# Altium PCB RemoteSensorUnit-v1.0.PcbDoc (part 1 of 5)
Units mm, origin at the board's own origin, x right, y up, seen from the top; angles counter-clockwise.
Board outline 80 x 114 mm, 2 copper layers (Top Layer, Bottom Layer), stack 1.448 mm thick; 163 components, 122 nets, 631 pads, 300 vias.
Unrouted connection lines stored in the file: 147.
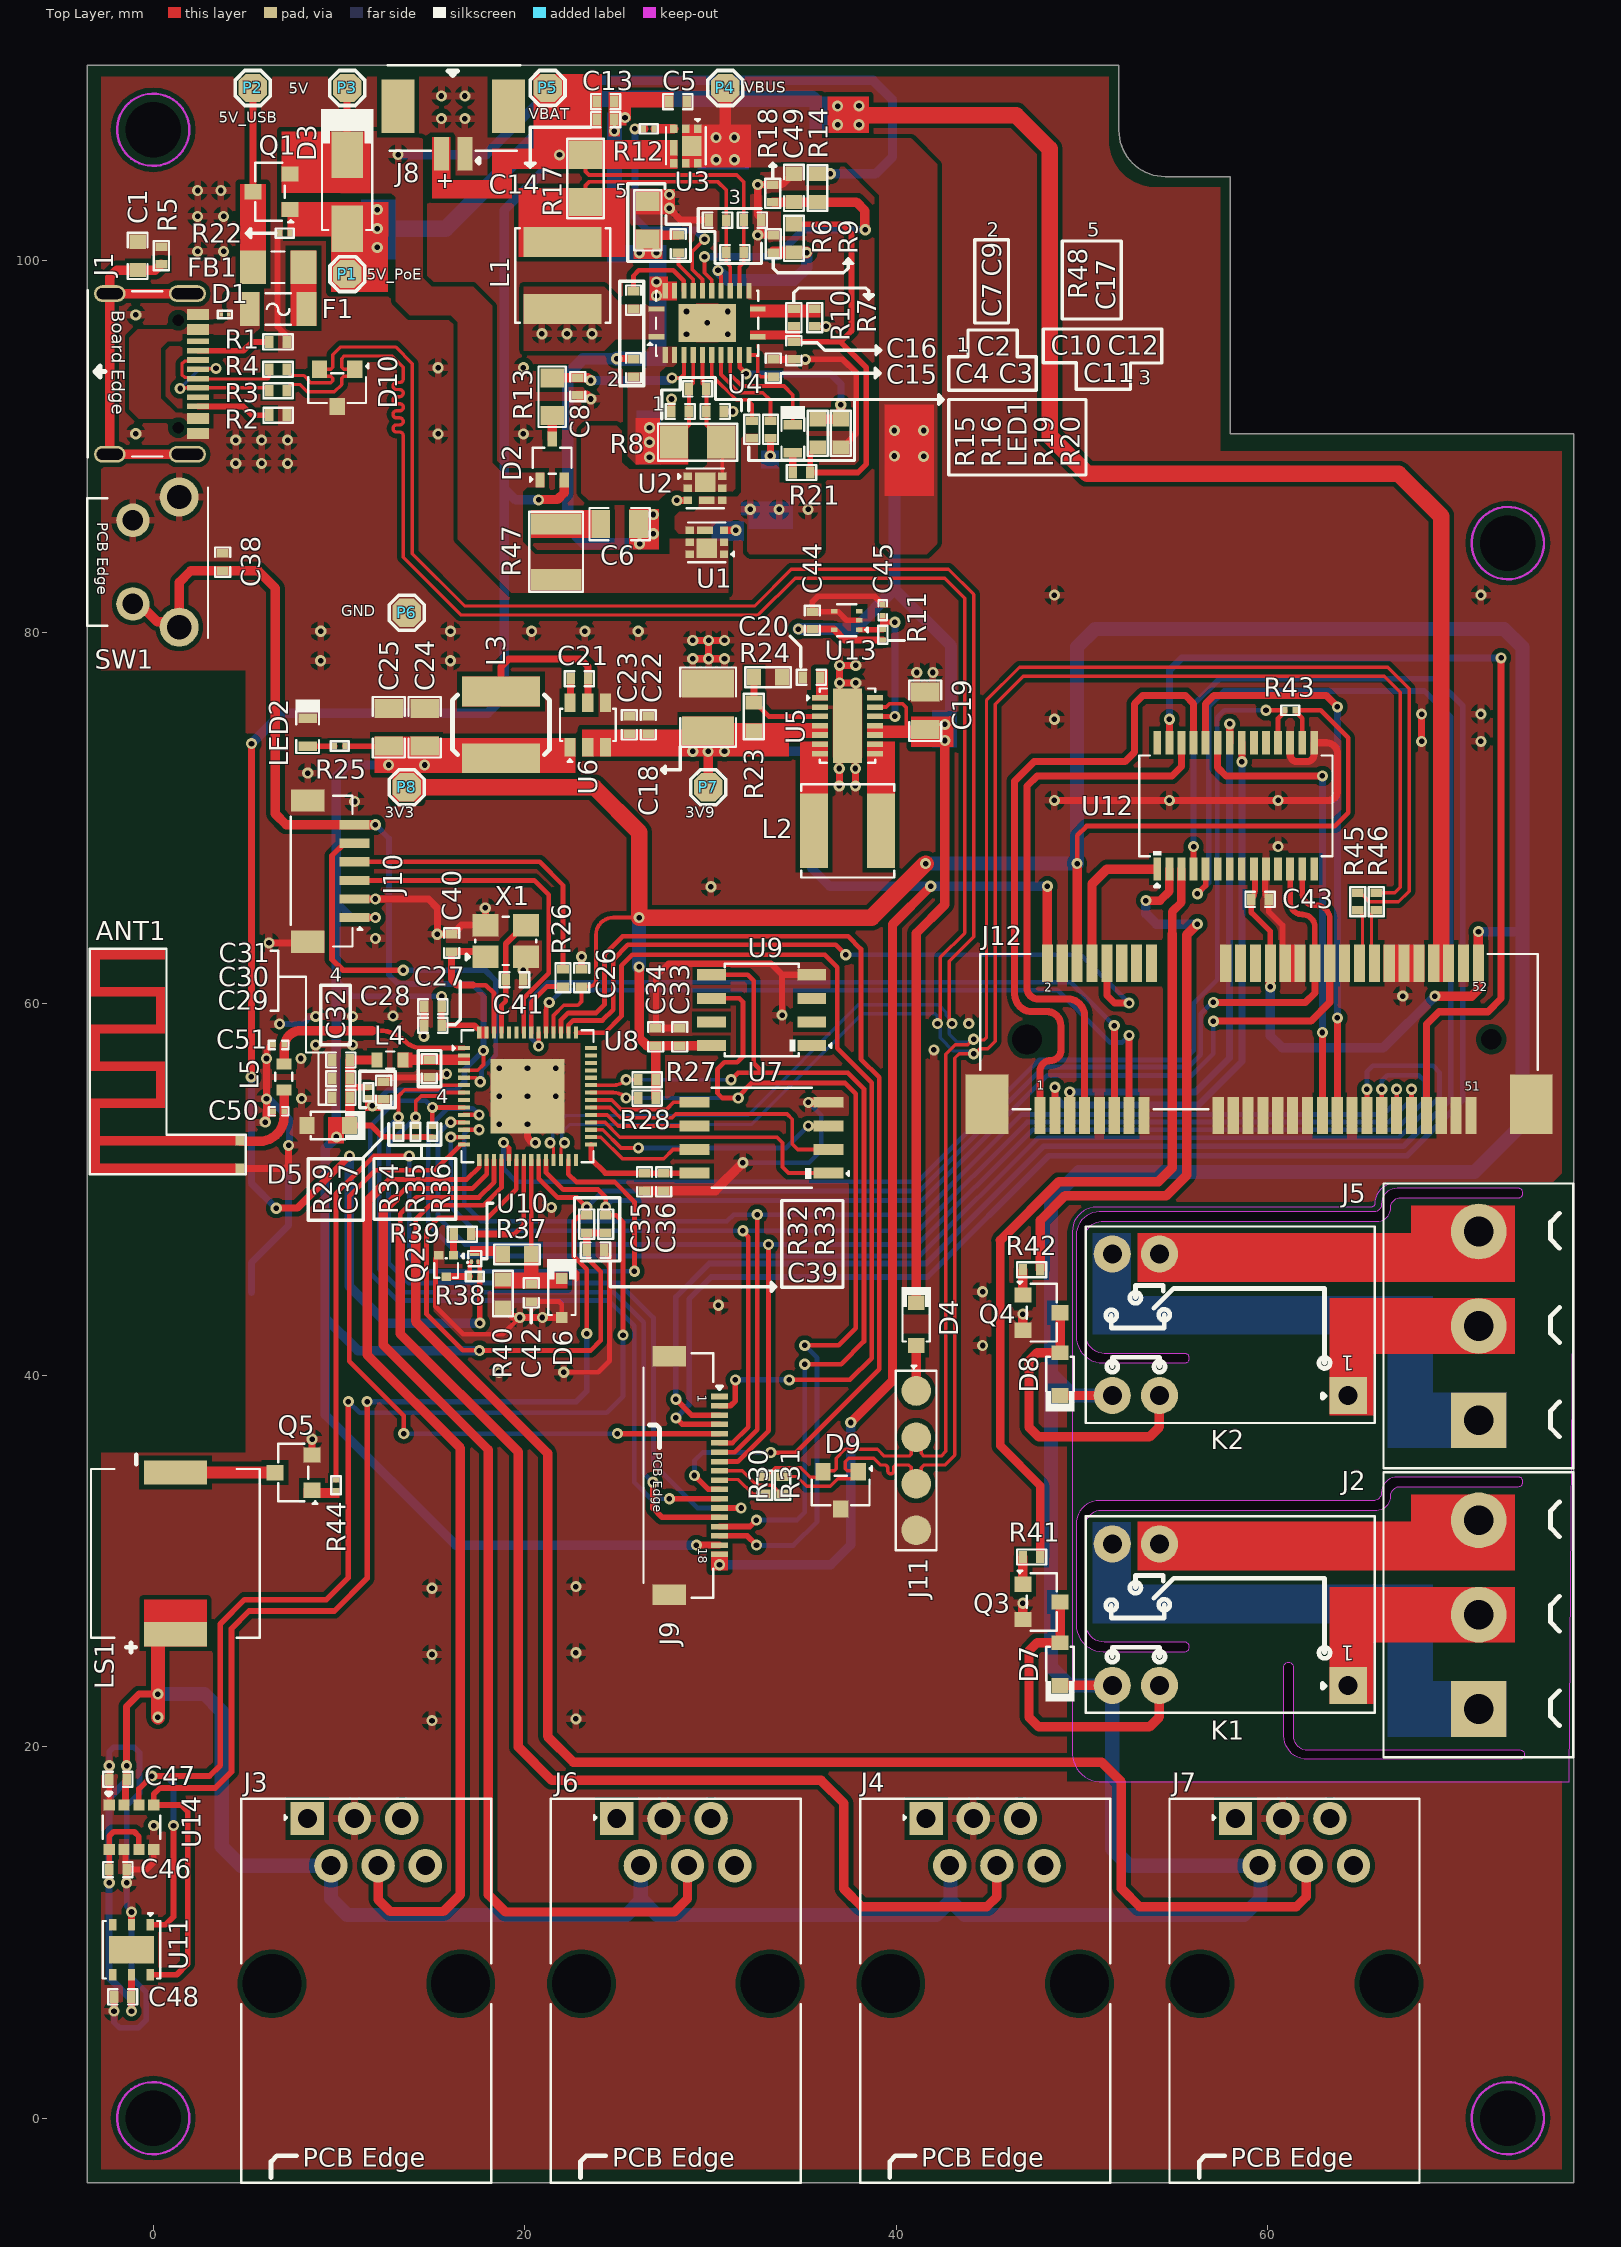
[diagram p0: Top Layer view]
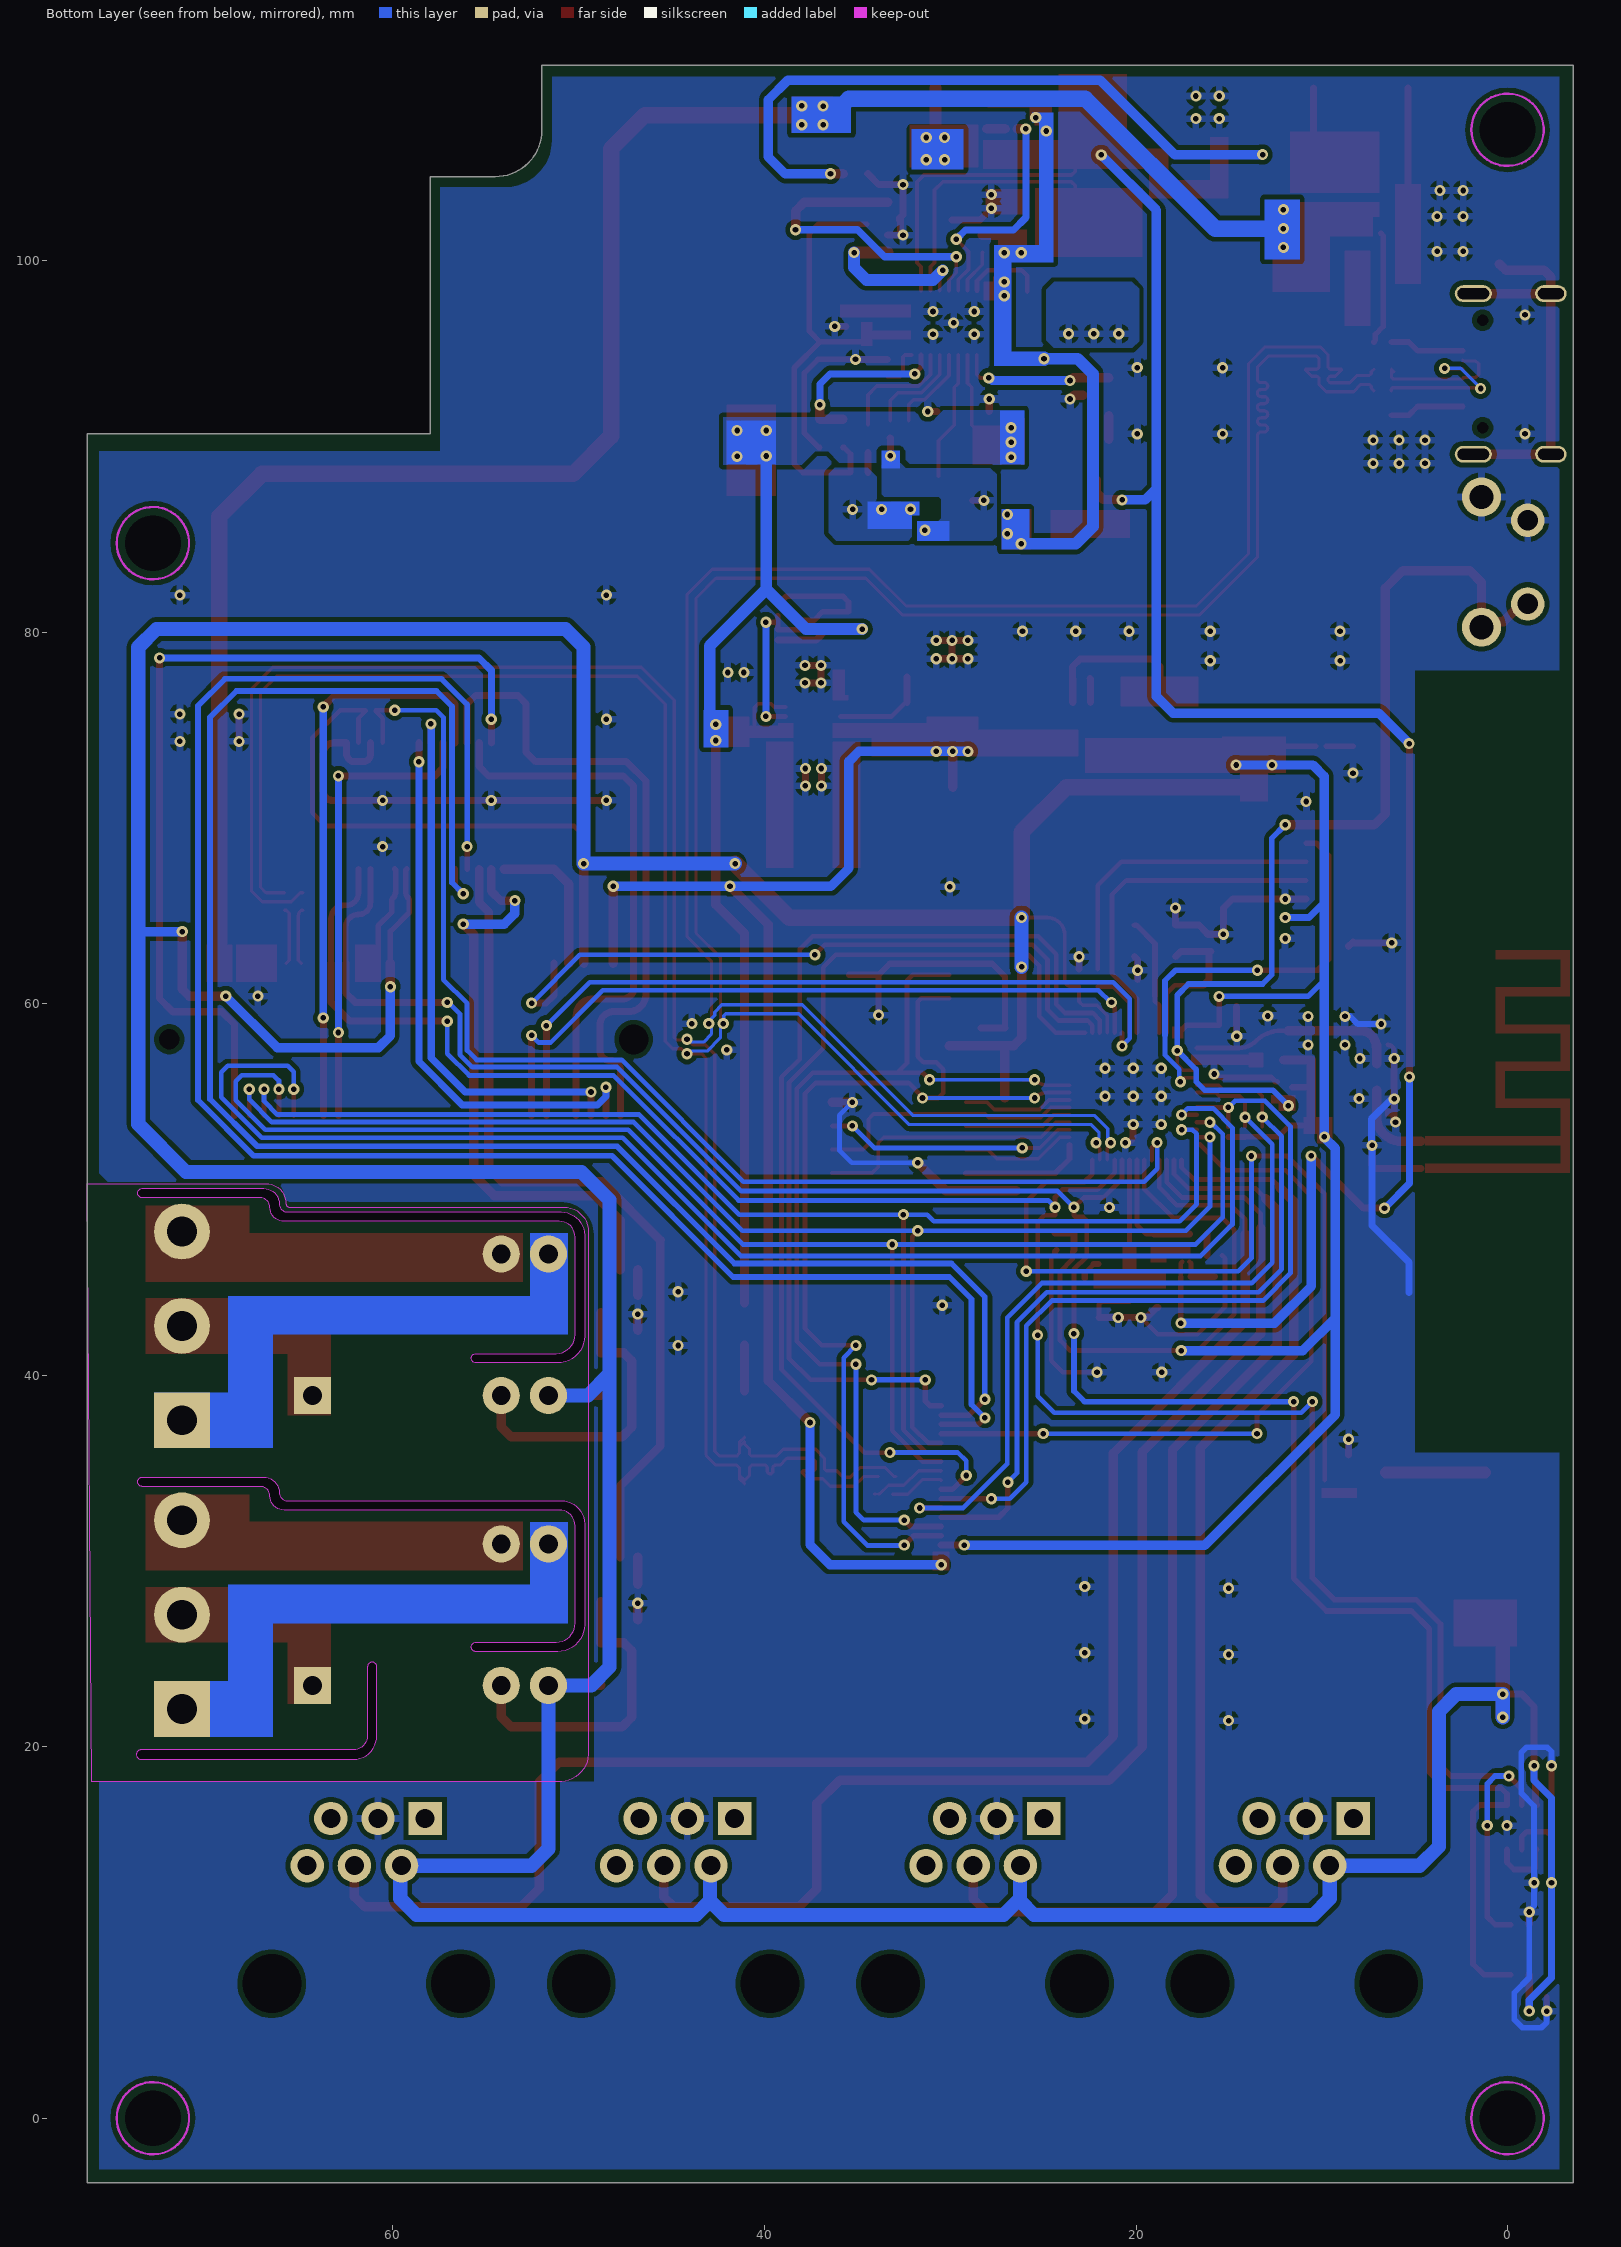
[diagram p1: Bottom Layer view, seen from below]
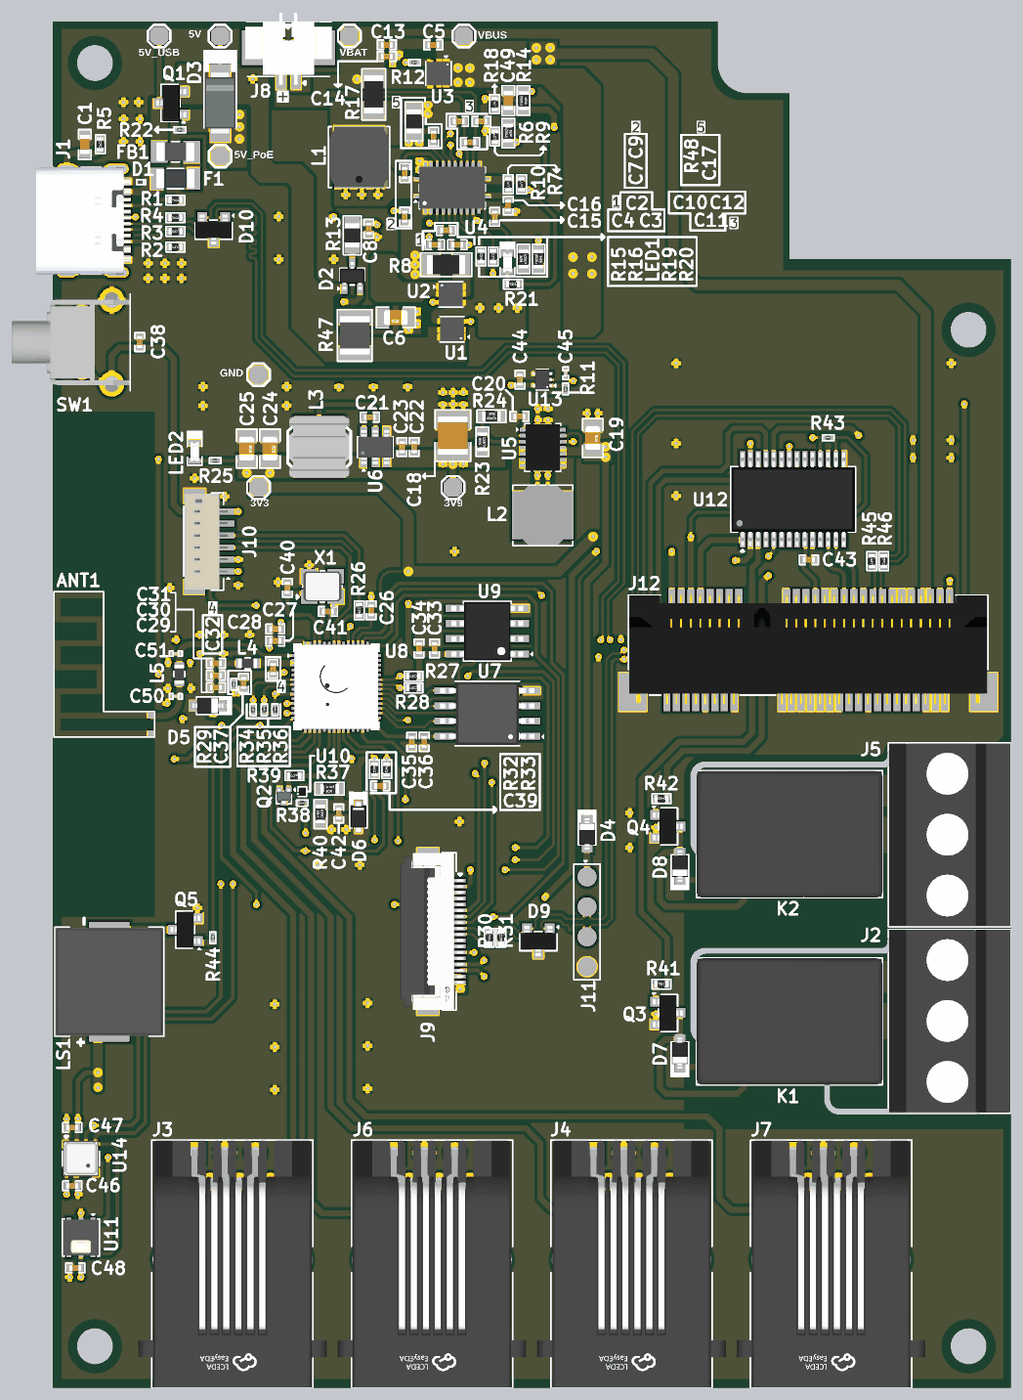
[diagram p4: 3D render of the assembled board from above, using the file's embedded part models]

## Layer stack, top to bottom
Top Solder: solder mask 0.0762, SM-001, Dk 4
Top Layer: signal copper 0.254
Dielectric 1: dielectric 0.9398, FR-4, Dk 4.8
Bottom Layer: signal copper 0.254
Bottom Solder: solder mask 0.0762, SM-001, Dk 4

## Board outline
-3.538,-3.476 -3.538,110.524 51.988,110.524 51.988,107.024 ccw(c54.488,107.024) 54.488,104.524 57.988,104.524 57.988,90.693 76.462,90.693 76.462,-3.476
cut-out: 49.689,42.11 ccw(c51.139,42.11) 51.139,40.66 55.531,40.66 ccw(c55.531,40.914) 55.785,40.914 ccw(c55.531,40.914) 55.531,41.168 51.212,41.168 cw(c51.212,42.183) 50.197,42.183 50.197,47.441 cw(c51.037,47.441) 51.037,48.28 65.864,48.28 ccw(c65.864,49.047) 66.63,49.047 cw(c67.134,49.047) 67.134,49.55 73.488,49.55 ccw(c73.488,49.804) 73.742,49.804 ccw(c73.488,49.804) 73.488,50.058 66.966,50.058 ccw(c66.966,49.215) 66.122,49.215 cw(c65.696,49.215) 65.696,48.788 50.942,48.788 ccw(c50.942,47.536) 49.689,47.536
cut-out: 49.689,26.567 ccw(c51.139,26.567) 51.139,25.117 55.531,25.117 ccw(c55.531,25.371) 55.785,25.371 ccw(c55.531,25.371) 55.531,25.625 51.212,25.625 cw(c51.212,26.64) 50.197,26.64 50.197,31.898 cw(c51.037,31.898) 51.037,32.737 65.864,32.737 ccw(c65.864,33.504) 66.63,33.504 cw(c67.134,33.504) 67.134,34.007 73.488,34.007 ccw(c73.488,34.261) 73.742,34.261 ccw(c73.488,34.261) 73.488,34.515 66.966,34.515 ccw(c66.966,33.672) 66.122,33.672 cw(c65.696,33.672) 65.696,33.245 50.942,33.245 ccw(c50.942,31.993) 49.689,31.993
cut-out: 60.865,20.594 60.865,24.299 cw(c61.119,24.299) 61.119,24.553 cw(c61.119,24.299) 61.373,24.299 61.373,20.594 ccw(c62.135,20.594) 62.135,19.832 73.565,19.832 cw(c73.565,19.578) 73.819,19.578 cw(c73.565,19.578) 73.565,19.324 62.135,19.324 cw(c62.135,20.594)

## Design rules (kind name [scope] priority, off if disabled: settings)
Clearance [All] p1: gap=0.178 ignorepadtopadclearanceinfootprint=TRUE except(0.127: Track-Track Track-SMDPad Track-Fill Poly-Hole; 0.254: Arc-Poly Track-Poly SMDPad-Poly THPad-Poly Via-Poly Fill-Poly Poly-Poly)
ComponentClearance [All] p1: gap=0 collisioncheckmode=3 verticalgap=0 showdistances=FALSE
DiffPairsRouting [InDifferentialPairClass('USB_DIFF_Lines')] p1: maxlimit=0.305 minlimit=0.305 mostfreqgap=0.305 toplayer_minwidth=0.178 toplayer_maxwidth=0.178 toplayer_prefwidth=0.178 bottomlayer_minwidth=0.178 bottomlayer_maxwidth=0.178 bottomlayer_prefwidth=0.178 impedanceprofiledriven=TRUE impedanceprofileid={DBD143A9-7C60-4718-A0EA-CE822F126A81} impedanceprofilevalue=90.000000 maxuncoupledlength=17.653
HoleSize [All] p1: absolutevalues=TRUE maxlimit=6 minlimit=0.025 maxpercent=80.000 minpercent=20.000
MatchedLengths "Schematic Matched Net Lengths_2" [InNetClass('USB_DIFF')] p1: tolerance=0.508 checknetsindiffpair=TRUE checkdiffpairvsdiffpair=FALSE checkxsignals=FALSE checkothers=FALSE
MaxMinImpedance "Schematic Impedance Constraint_4" [InNetClass('GSM_USB')] p1: minimum=88.00 maximum=90.00
MaxMinImpedance "Schematic Impedance Constraint_2" [InNetClass('USB_DIFF')] p2: minimum=85.00 maximum=95.00
MinimumSolderMaskSliver [All] p1: minsoldermaskwidth=0
PolygonConnect [All] p1: thpad.connectstyle=Relief thpad.reliefconductorwidth=0.381 thpad.reliefentries=4 thpad.polygonreliefangle="90 Angle" thpad.airgapwidth=0.254 smdpad.connectstyle=Direct smdpad.reliefconductorwidth=0.381 smdpad.reliefentries=4 smdpad.polygonreliefangle="90 Angle" smdpad.airgapwidth=0.254 via.connectstyle=Relief via.reliefconductorwidth=0.381 via.reliefentries=4 via.polygonreliefangle="90 Angle" via.airgapwidth=0.254
RoutingVias [All] p1: holewidth=0.3 width=0.6 viastyle="Through Hole" minholewidth=0.3 minwidth=0.6 maxholewidth=0.3 maxwidth=0.6
SilkToSilkClearance [All] p1: silktosilkclearance=0
SilkToSolderMaskClearance [IsPad] p1: minsilkscreentomaskgap=0 clearancetoexposedcopper=TRUE
SolderMaskExpansion [All] p1: expansion=0.102 istentingtop=FALSE
UnRoutedNet [All] p1: checkbadconnections=TRUE
Width [All] p1: maxlimit=1 minlimit=0.178 preferedwidth=0.381 minimp=50.000000 maximp=50.000000 favimp=50.000000
23 further rules are at their usual default settings.

## Classes and differential pairs
differential pair class GSM_USB_Lines: USB.USB
net class GSM_USB: USB.USB_N USB.USB_P
differential pair class USB_DIFF_Lines: USB.USB
net class USB_DIFF: USB.USB_N USB.USB_P
component class U_Relay_Buzzer_Temp_Humd_Sheet: C43 C46 C47 C48 D7 D8 K1 K2 LS1 Q3 Q4 Q5 R41 R42 R43 R44 U11 U12 U14
component class U_Power_Sheet2: C18 C19 C20 C21 C22 C23 C24 C25 C44 C45 L2 L3 LED2 P7 P8 R11 R23 R24 R25 U5 U6 U13
component class U_Power_Sheet1: C2 C3 C4 C5 C6 C7 C8 C9 C10 C11 C12 C13 C14 C15 C16 C17 C49 D2 D3 L1 LED1 P1 P2 P3 P4 P5 P6 Q1 R6 R7 R8 R9 R10 R12 R13 R14 R15 R16 R17 R18 R19 R20 R21 R22 R47 R48 U1 U2 U3 U4
component class U_mPCIe_Connector_Sheet: J12 R45 R46
component class U_Controller_Sheet: ANT1 C26 C27 C28 C29 C30 C31 C32 C33 C34 C35 C36 C37 C38 C39 C40 C41 C42 C50 C51 D4 D5 D6 D9 J9 J10 J11 L4 L5 Q2 R26 R27 R28 R29 R30 R31 R32 R33 R34 R35 R36 R37 R38 R39 R40 SW1 U7 U8 U9 U10 X1
component class U_Connector_Sheet: C1 D1 D10 F1 FB1 J1 J2 J3 J4 J5 J6 J7 J8 R1 R2 R3 R4 R5
differential pair USB.USB: +USB.USB_P -USB.USB_N

## Components (designator, comment, footprint, x,y, rotation, side; value= is the part's Value field where it differs from the comment)
ANT1 "Antenna" ANT* 1.59,55.815 r90 top locked net-tie
C1 "4.7nF" Cap-0603 -0.838,100.257 r270 top locked
C2 "0.1uf" Cap-0402#1 29.312,93.094 r0 top locked
C3 "0.1uf" Cap-0402#1 30.251,91.88 r0 top locked
C4 "0.1uf" Cap-0402#1 28.372,91.88 r180 top locked
C5 "10uF" Cap-0402#1 28.244,108.564 r180 top locked
C6 "2.2uF" Cap-0805 25.114,85.821 r180 top locked
C7 "10uF" Cap-0402#1 25.858,94.23 r270 top locked
C8 "1uF" Cap-0402#1 22.86,93.221 r270 top locked
C9 "47nF" Cap-0402#1 25.858,97.873 r270 top locked
C10 "0.1uf" Cap-0402#2 30.378,102.187 r180 top locked
C11 "0.1uf" Cap-0402#1 31.318,100.435 r180 top locked
C12 "0.1uf" Cap-0402#1 32.258,102.187 r0 top locked
C13 "10uF" Cap-0402#1 24.359,108.564 r0 top locked
C14 "10uF" Cap-0402#1 24.359,107.597 r0 top locked
C15 "0.1uf" Cap-0402#1 33.379,94.218 r270 top locked
C16 "1uF" Cap-0402#1 34.496,95.158 r90 top locked
C17 "1uF" Cap-0402#1 28.27,100.904 r270 top locked
C18 "100uF" Cap-1210 29.877,75.966 r270 top locked
C19 "22uF" Cap-0805 41.561,75.772 r270 top locked
C20 "0.1uf" Cap-0402#1 35.434,77.575 r180 top locked
C21 "0.1uf" Cap-0402#1 22.94,77.499 r180 top locked
C22 "10uF" Cap-0402#1 26.649,75.01 r270 top locked
C23 "0.1uf" Cap-0402#1 25.633,75.01 r270 top locked
C24 "22uF" Cap-0805 14.612,74.883 r270 top locked
C25 "22uF" Cap-0805 12.677,74.883 r270 top locked
C26 "0.1uf" Cap-0402#1 23.063,61.395 r270 top locked
C27 "1uF" Cap-0402#1 15.054,58.837 r0 top locked
C28 "10nF" Cap-0402#1 15.054,59.837 r0 top locked
C29 "10uF" Cap-0402#1 10.103,54.952 r0 top locked
C30 "1uF" Cap-0402#1 10.103,55.961 r0 top locked
C31 "0.1uf" Cap-0402#1 10.103,56.969 r0 top locked
C32 "0.1uf" Cap-0402#1 14.867,56.499 r90 top locked
C33 "0.1uf" Cap-0402#1 28.345,58.217 r270 top locked
C34 "10uF" Cap-0402#1 27.061,58.217 r270 top locked
C35 "1uF" Cap-0402#1 26.45,50.41 r90 top locked
C36 "0.1uf" Cap-0402#1 27.491,50.41 r90 top locked
C37 "0.1uf" Cap-0402#1 12.403,55.333 r270 top locked
C38 "1uF" Cap-0402#1 3.738,83.773 r270 top locked
C39 "0.1uf" Cap-0402#1 23.811,46.739 r180 top locked
C40 "22PF" Cap-0402#1 16.063,63.269 r270 top locked value=22pF
C41 "22PF" Cap-0402#1 19.45,61.293 r180 top locked value=22pF
C42 "0.1uf" Cap-0402#1 20.352,44.436 r270 top locked
C43 "0.1uf" Cap-0402#1 59.593,65.612 r0 top locked
C44 "1uF" Cap-0402#1 35.479,80.636 r90 top locked
C45 "1nF" CAP-0201 39.279,81.183 r270 top locked
C46 "0.1uf" Cap-0402#1 -1.898,13.389 r0 top locked
C47 "0.1uf" Cap-0402#1 -1.898,18.252 r0 top locked
C48 "0.1uf" Cap-0402#1 -1.638,6.531 r180 top locked
C49 "330pF" Cap-0603 34.496,103.919 r270 top locked
C50 "2.7pF" CAP-0201 6.752,54.212 r0 top
C51 "4.7pF" CAP-0201 6.752,57.784 r0 top
D1 "PESD5V0H1BSFYL" DSN0603-2 3.861,97.103 r180 top locked
D2 "BAT54CW" SOT_323 21.476,89.294 r0 top locked
D3 "SS36" SMA 10.444,103.712 r270 top locked
D4 "1N4148WS-7-F" SOD-323 41.076,42.752 r270 top locked
D5 "UDD32C03L01" SOD-323 9.423,53.439 r180 top locked
D6 "MM3Z3V3B" SOD323F 21.996,44.156 r90 top locked
D7 "1N4148WS-7-F" SOD-323 48.823,24.449 r90 top locked
D8 "1N4148WS-7-F" SOD-323 48.823,40.058 r90 top locked
D9 "ESD5302F-3/TR" Sot-23 37.012,33.802 r180 top locked
D10 "ESD5302F-3/TR" Sot-23 9.906,93.153 r180 top locked
F1 "1206L300SLTHYR" "Fuse 1206 (3216 Metric)" 6.724,97.402 r0 top locked
FB1 "100MHz" IND-1206 6.724,99.648 r180 top locked
J1 "TYPE-C-31-M-12" TYPE-C-31-M-12_ 2.413,97.103 r270 top locked
J2 "DB128L-5.08-3P-BK-S" DB128L-5.08-3P-BK-S 71.363,27.109 r90 top locked
J3 "DS1133-01-S60BPS" DS1133-01-S60BPS 11.474,14.864 r0 top locked
J4 "DS1133-01-S60BPS" DS1133-01-S60BPS 44.786,14.864 r0 top locked
J5 "DB128L-5.08-3P-BK-S" DB128L-5.08-3P-BK-S 71.363,42.652 r90 top locked
J6 "DS1133-01-S60BPS" DS1133-01-S60BPS 28.13,14.864 r0 top locked
J7 "DS1133-01-S60BPS" DS1133-01-S60BPS 61.443,14.864 r0 top locked
J8 "1.25-2PWB" 1.25-2PWB 16.154,107.039 r180 top locked
J9 "F0502-B-18-15T-R" F0502-B-18-15T-R 29.138,34.602 r270 top locked
J10 "Voltlink Target" "Voltlink Target" 9.58,67.136 r90 top locked
J11 "POGO Connector 4 Pin" "Pogo 4 Pin" 41.076,35.406 r270 top locked
J12 "91304-99-052R2" 91304-99-052R2 59.541,58.078 r0 top locked
K1 "J102K1CS33VDC.20" J102K1CS33VDC.20 64.333,23.299 r180 top locked
K2 "J102K1CS33VDC.20" J102K1CS33VDC.20 64.333,38.908 r180 top locked
L1 "3.3uH" VLS5045EX-3R3N 22.048,99.203 r90 top locked
L2 "2.2uH" NRS5024T2R2NMGJ 37.379,69.307 r180 top locked
L3 "6.8uH" LVC505040-6R8M-N_ 18.724,75.01 r270 top locked
L4 "2nH" "IND-0603 (1608 Metric)" 12.741,56.969 r0 top locked
L5 "1.6nH" "IND-0603 (1608 Metric)" 7.036,56.058 r90 top
LED1 "RED" LED-0603 34.433,90.417 r90 top locked
LED2 "RED" LED-0603 8.318,74.617 r90 top locked
LS1 "PKMCS0909E4000-R1" PKMCS0909E4000-R1 1.198,30.405 r90 top locked
P1 "TEST POINT" Test-point 10.454,99.278 r0 top locked
P2 "TEST POINT" Test-point 5.364,109.3 r270 top locked
P3 "TEST POINT" Test-point 10.444,109.3 r0 top locked
P4 "TEST POINT" Test-point 30.798,109.3 r180 top locked
P5 "TEST POINT" Test-point 21.234,109.3 r90 top locked
P6 "TEST POINT" Test-point 13.65,81.046 r270 top locked
P7 "TEST POINT" Test-point 29.877,71.648 r270 top locked
P8 "TEST POINT" Test-point 13.65,71.648 r180 top locked
Q1 "WPM3401-3/TR" SOT-23-3L_ 6.364,103.712 r90 top locked
Q2 "MMBT3904M" SOT-723 15.772,45.885 r180 top locked
Q3 "MMBT2222A-7-F" SOT-23 47.823,27.795 r270 top locked
Q4 "MMBT2222A-7-F" SOT-23 47.823,43.365 r270 top locked
Q5 "MMBT2222A-7-F" SOT-23 7.553,34.755 r90 top locked
R1 "5.1K" Res-0402 6.718,95.624 r0 top locked
R2 "5.1K" Res-0402 6.724,91.686 r0 top locked
R3 "0R" Res-0402 6.724,93.003 r0 top locked
R4 "0R" Res-0402 6.718,94.153 r0 top locked
R5 "1MR" Res-0402 0.441,100.27 r90 top locked
R6 "100K" Res-0603 34.496,101.201 r90 top locked
R7 "232k" Res-0402 34.496,96.933 r270 top locked
R8 "20mR" Res-1206 29.312,90.229 r180 top locked
R9 "43k" Res-0402 33.379,100.909 r270 top locked
R10 "15K" Res-0402 35.614,96.933 r90 top locked
R11 "10K" Res-0201 39.279,79.861 r270 top locked
R12 "1K" Res-0201 26.674,107.097 r180 top locked
R13 "10R" RES-0805 21.476,92.675 r90 top locked
R14 "100K" Res-0603 35.763,103.914 r90 top locked
R15 "4.02K" Res-0402 32.232,90.917 r90 top locked
R16 "4.02K" Res-0402 33.232,90.917 r90 top locked
R17 "10mR" Res-1206 23.273,104.427 r90 top locked
R18 "39K" Res-0402 33.356,103.627 r270 top locked
R19 "5.23K" Res-0603 35.775,90.702 r270 top locked
R20 "30.1K" Res-0603 37.018,90.702 r90 top locked
R21 "1.5K" Res-0402 34.903,88.596 r180 top locked
R22 "10K" Res-0201 7.089,101.482 r0 top locked
R23 "680K" Res-0603 32.334,75.458 r270 top locked value=680kR
R24 "100K" Res-0603 33.096,77.575 r180 top locked
R25 "470R" Res-0201 10.043,73.867 r0 top locked
R26 "499R" Res-0402 22.062,61.395 r90 top locked
R27 "4.7K" Res-0402 26.591,55.904 r0 top locked
R28 "4.7K" Res-0402 26.591,54.924 r0 top locked
R29 "10K" Res-0201 11.589,55.227 r90 top locked
R30 "0R" Res-0402 33.884,34.076 r90 top
R31 "0R" Res-0402 32.923,34.076 r90 top
R32 "4.7K" Res-0402 23.341,48.136 r270 top locked
R33 "4.7K" Res-0402 24.359,48.136 r270 top locked
R34 "10K" Res-0201 13.203,53.105 r270 top locked
R35 "10K" Res-0201 14.129,53.102 r270 top locked
R36 "10K" Res-0201 15.029,53.102 r270 top locked
R37 "100K" Res-0603 19.59,46.502 r0 top locked
R38 "1K" Res-0201 17.31,45.31 r180 top locked
R39 "4.7K" Res-0402 16.642,47.595 r180 top locked
R40 "100K" Res-0603 18.828,44.397 r270 top locked
R41 "4.7K" Res-0402 47.293,30.212 r180 top locked
R42 "4.7K" Res-0402 47.293,45.682 r180 top locked
R43 "10K" Res-0201 61.207,75.797 r0 top locked
R44 "1K" Res-0201 9.839,34.08 r270 top locked
R45 "0R" Res-0402 64.842,65.497 r90 top locked
R46 "0R" Res-0402 65.842,65.497 r90 top locked
R47 "2R" Res_1210 21.692,84.331 r270 top locked
R48 "0R" Res-0805 26.626,102.174 r270 top locked
SW1 "1825027-8" 1825027-8 0.156,83.772 r270 top locked
U1 "CSD17313Q2" CSD17313Q2 29.806,84.839 r180 top locked
U2 "CSD17313Q2" CSD17313Q2 29.71,87.746 r0 top locked
U3 "CSD25310Q2" CSD25310Q2 28.677,106.175 r270 top locked
U4 "BQ24133RGYR" "24-VQFN (5.5x3.5)" 29.82,96.653 r90 top locked
U5 "RT6154AGQW" DFN-14(3x4) 37.379,74.967 r0 top locked
U6 "AP63203WU-7" TSOT-23-6 23.398,75.01 r90 top locked
U7 "W25Q64JVSSIQ TR" "SOIC-8 (208 mil)" 32.755,52.785 r180 top locked
U8 "ESP32-S3R8" "56-QFN (7x7)" 20.152,55.015 r0 top locked
U9 "ATECC608B-SSHDA-B" SOIC-8 32.755,59.652 r180 top locked
U10 "CSD25501F3" PicoStar-3 17.31,46.302 r0 top locked
U11 "HTU21D" DFN-6-EP(3x3) -1.168,9.071 r270 top locked
U12 "MCP23017T-E/SS" SSOP-28-208mil 58.282,70.647 r90 top locked
U13 "BD4830FVE-TR" VSOF-5 37.341,80.636 r180 top locked
U14 "BME680" BME680 -1.168,15.666 r90 top locked
X1 "40MHz" X322540MPB4SI_ 18.98,63.38 r0 top locked value=40MHZ

## Footprints (in the part's own frame and the unit in brackets; to place one, negate y for a bottom-side part, rotate by r counter-clockwise, add the part's x,y. Pads: shape width x height; smd on the part's side, far side on the other; paste and mask are expansions set on the pad)
1.25-2PWB [mm]
  rect 0.8x1.8 smd: 1(-0.625,1.275) 2(0.625,1.275)
  rect 1.8x2.9 smd: MP1(-2.975,-1.275) MP2(2.975,-1.275)
  silkscreen extent -3.6,-3.48 3.52,1.78, body extent -3.62,-4.24 3.62,1.81, height 3.5
"24-VQFN (5.5x3.5)" [mm]
  rect 0.28x0.85 smd: 1(-0.75,2.725) 12(-0.75,-2.725) 13(0.75,-2.725) 24(0.75,2.725)
  rect 0.85x0.28 smd: 2(-1.725,2.25) 3(-1.725,1.75) 4(-1.725,1.25) 5(-1.725,0.75) 6(-1.725,0.25) 7(-1.725,-0.25) 8(-1.725,-0.75) 9(-1.725,-1.25) 10(-1.725,-1.75) 11(-1.725,-2.25) 14(1.725,-2.25) 15(1.725,-1.75) 16(1.725,-1.25) 17(1.725,-0.75) 18(1.725,-0.25) 19(1.725,0.25) 20(1.725,0.75) 21(1.725,1.25) 22(1.725,1.75) 23(1.725,2.25)
  rect 2.05x3.1 smd paste-3: 25(0,0)
  silkscreen extent -1.76,-2.75 1.74,3.2, body extent -1.75,-2.75 1.75,2.75, height 1
"56-QFN (7x7)" [mm]
  rect 0.65x0.22 smd: 1(-3.425,2.6) 2(-3.425,2.2) 3(-3.425,1.8) 4(-3.425,1.4) 5(-3.425,1) 6(-3.425,0.6) 7(-3.425,0.2) 8(-3.425,-0.2) 9(-3.425,-0.6) 10(-3.425,-1) 11(-3.425,-1.4) 12(-3.425,-1.8) 13(-3.425,-2.2) 14(-3.425,-2.6) 29(3.425,-2.6) 30(3.425,-2.2) 31(3.425,-1.8) 32(3.425,-1.4) 33(3.425,-1) 34(3.425,-0.6) 35(3.425,-0.2) 36(3.425,0.2) 37(3.425,0.6) 38(3.425,1) 39(3.425,1.4) 40(3.425,1.8) 41(3.425,2.2) 42(3.425,2.6)
  rect 0.22x0.65 smd: 15(-2.6,-3.425) 16(-2.2,-3.425) 17(-1.8,-3.425) 18(-1.4,-3.425) 19(-1,-3.425) 20(-0.6,-3.425) 21(-0.2,-3.425) 22(0.2,-3.425) 23(0.6,-3.425) 24(1,-3.425) 25(1.4,-3.425) 26(1.8,-3.425) 27(2.2,-3.425) 28(2.6,-3.425) 43(2.6,3.425) 44(2.2,3.425) 45(1.8,3.425) 46(1.4,3.425) 47(1,3.425) 48(0.6,3.425) 49(0.2,3.425) 50(-0.2,3.425) 51(-0.6,3.425) 52(-1,3.425) 53(-1.4,3.425) 54(-1.8,3.425) 55(-2.2,3.425) 56(-2.6,3.425)
  rect 4x4 smd: 57(0,0)
  silkscreen extent -4.04,-3.56 3.56,3.56, body extent -3.5,-3.51 3.5,3.49, height 0.92
91304-99-052R2 [mm]
  rect 0.6x2 smd: 1(-11.8,-4.1) 2(-11.4,4.1) 3(-11,-4.1) 4(-10.6,4.1) 5(-10.2,-4.1) 6(-9.8,4.1) 7(-9.4,-4.1) 8(-9,4.1) 9(-8.6,-4.1) 10(-8.2,4.1) 11(-7.8,-4.1) 12(-7.4,4.1) 13(-7,-4.1) 14(-6.6,4.1) 15(-6.2,-4.1) 16(-5.8,4.1) 17(-2.2,-4.1) 18(-1.8,4.1) 19(-1.4,-4.1) 20(-1,4.1) 21(-0.6,-4.1) 22(-0.2,4.1) 23(0.2,-4.1) 24(0.6,4.1) 25(1,-4.1) 26(1.4,4.1) 27(1.8,-4.1) 28(2.2,4.1) 29(2.6,-4.1) 30(3,4.1) 31(3.4,-4.1) 32(3.8,4.1) 33(4.2,-4.1) 34(4.6,4.1) 35(5,-4.1) 36(5.4,4.1) 37(5.8,-4.1) 38(6.2,4.1) 39(6.6,-4.1) 40(7,4.1) 41(7.4,-4.1) 42(7.8,4.1) 43(8.2,-4.1) 44(8.6,4.1) 45(9,-4.1) 46(9.4,4.1) 47(9.8,-4.1) 48(10.2,4.1) 49(10.6,-4.1) 50(11,4.1) 51(11.4,-4.1) 52(11.8,4.1)
  rect 2.3x3.2 smd: 53(-14.65,-3.5) 54(14.65,-3.5)
  rect 0x0 hole 1.6 unplated: MH(-12.5,0)
  rect 0x0 hole 1.1 unplated: MH(12.5,0)
  silkscreen extent -15.01,-3.76 15.01,4.6, body extent -14.96,-4.55 14.94,4.55, height 9.96
1825027-8 [mm]
  round 1.8 hole 1.1: 1(-2.25,-1.245) 2(2.25,-1.245)
  round 2.1 hole 1.3: 3(3.505,1.245) 4(-3.505,1.245)
  silkscreen extent -4.01,-3.71 4.06,2.79, body extent -4.18,-7.11 4.23,2.73, height 8
ANT* [mm]
  rect 0.5x0.5 smd: ANT#(-3.2,-3.08) GND(-4.678,-3.079)
  Top Layer region: 5.072,4.941 4.572,4.941 4.572,0.941 5.072,0.941
  Top Layer region: 2.572,0.941 3.072,0.941 3.072,4.941 2.572,4.941
  Top Layer region: 5.072,0.942 5.072,1.442 2.572,1.442 2.572,0.942
  Top Layer region: 1.071,0.941 1.071,1.441 -1.429,1.441 -1.429,0.941
  Top Layer region: -1.428,0.941 -0.928,0.941 -0.928,4.941 -1.428,4.941
  Top Layer region: 1.072,4.941 0.572,4.941 0.572,0.941 1.072,0.941
  Top Layer region: 6.572,0.941 7.072,0.941 7.072,4.941 6.572,4.941
  Top Layer region: -4.928,4.941 -4.928,4.441 -0.928,4.441 -0.928,4.941
  Top Layer region: 4.571,4.941 4.571,4.441 7.071,4.441 7.071,4.941
  Top Layer region: 0.57,4.941 0.57,4.441 3.07,4.441 3.07,4.941
  Top Layer region: -4.93,-2.86 -4.43,-2.86 -4.43,4.94 -4.93,4.94
  Top Layer region: -3.45,-2.86 -2.95,-2.86 -2.95,4.94 -3.45,4.94
  silkscreen extent -5,-3.4 7.14,5.01
BME680 [mm]
  rect 0.6x0.6 smd: 1(1.2,1.2) 2(1.2,0.4) 3(1.2,-0.4) 4(1.2,-1.2) 5(-1.2,-1.2) 6(-1.2,-0.4) 7(-1.2,0.4) 8(-1.2,1.2)
  silkscreen extent -0.64,-1.55 1.85,1.55, body extent -1.5,-1.5 1.5,1.5, height 1
CAP-0201 [mm]
  rect 0.3x0.3 smd mask+0.055: 1(-0.3,0) 2(0.3,0)
  silkscreen extent -0.53,-0.23 0.53,0.23, body extent -0.3,-0.15 0.3,0.15, height 0.28
Cap-0402#1 [mil]
  rect 18x25 smd mask+2.36: 1(-18.5,0) 2(18.5,0)
  silkscreen extent -31,-16 31,16, body extent -20,-10 20,10, height 19
Cap-0402#2 [mil]
  rect 18x25 smd mask+2.36: 1(-18.5,0.5) 2(18.5,0)
  silkscreen extent -31,-16 31,16, body extent -20,-10 20,10, height 19
Cap-0603 [mil]
  rect 30x35 smd mask+2.36: 1(-30,0) 2(30,0)
  silkscreen extent -49,-21 49,21, body extent -32,-16 31,16, height 34
Cap-0805 [mil] "SMD 0805"
  rect 40x60 smd mask+2.76: 1(-40,0) 2(40,0)
  silkscreen extent -64,-34 64,34, body extent -39,-25 39,25, height 30
Cap-1210 [mil] "SMD 1210"
  rect 60x110 smd: 1(-50,0) 2(50,0)
  silkscreen extent -84,-59 84,59, body extent -63,-49 63,49, height 39
CSD17313Q2 [mm] "6-WSON (2x2)"
  rect 0.455x0.4 smd paste-1: 1(-0.923,0.65) 2(-0.923,0) 3(-0.923,-0.65) 4(0.923,-0.65) 5(0.923,0) 6(0.923,0.65)
  rect 0.85x0.4 smd paste-0.05: 7(0.096,-0.65)
  rect 1.1x1.05 smd paste-0.05: 8(0,0.325)
  silkscreen extent -1.45,-1.07 1,1.07, body extent -1,-1 1,1, height 0.8
CSD25310Q2 [mm]
  rect 0.455x0.4 smd paste-1: 1(-0.923,0.65) 2(-0.923,0) 3(-0.923,-0.65) 4(0.923,-0.65) 5(0.923,0) 6(0.923,0.65)
  rect 1.1x1.05 smd paste-0.05: 7(0,0.325)
  rect 0.85x0.4 smd paste-0.05: 8(0.096,-0.65)
  silkscreen extent -1.45,-1.07 1,1.07, body extent -1,-1 1,1, height 0.8
DB128L-5.08-3P-BK-S [mm]
  rect 3x3 hole 1.6: 1(-5.08,0)
  round 3 hole 1.6: 2(0,0) 3(5.08,0)
  silkscreen extent -7.67,-5.08 7.67,5.13, body extent -7.59,-5.03 7.65,5.07, height 10.1
DFN-6-EP(3x3) [mm]
  rect 0.62x0.4 smd: 1(-1.35,1) 2(-1.35,0) 3(-1.35,-1) 4(1.35,-1) 5(1.35,0) 6(1.35,1)
  rect 1.5x2.4 smd: 7(0,0)
  silkscreen extent -1.96,-1.55 1.55,1.55, body extent -1.5,-1.5 1.5,1.5, height 0.9
DFN-14(3x4) [mm]
  rect 0.85x0.3 smd: 1(-1.475,1.5) 2(-1.475,1) 3(-1.475,0.5) 4(-1.475,0) 5(-1.475,-0.5) 6(-1.475,-1) 7(-1.475,-1.5) 8(1.475,-1.5) 9(1.475,-1) 10(1.475,-0.5) 11(1.475,0) 12(1.475,0.5) 13(1.475,1) 14(1.475,1.5)
  rect 1.58x4 smd paste-3: 15(0,0)
  silkscreen extent -2.18,-2 1.5,2, body extent -1.5,-2 1.5,2, height 0.7
DS1133-01-S60BPS [mm]
  rect 1.8x1.8 hole 1.02: 1(-3.175,1.27)
  round 1.8 hole 1.02: 2(-1.905,-1.27) 3(-0.635,1.27) 4(0.635,-1.27) 5(1.905,1.27) 6(3.175,-1.27)
  round 0 hole 3.17 unplated: MH(-5.08,-7.62) MH(5.08,-7.62)
  silkscreen extent -6.73,-18.34 6.73,2.34, body extent -7.88,-18.27 7.87,2.3, height 16.08
DSN0603-2 [mm]
  rect 0.2x0.24 smd mask+0.055: 1(-0.2,0) 2(0.2,0)
  silkscreen extent -0.38,-0.2 0.38,0.2, body extent -0.3,-0.15 0.3,0.15, height 0.32
F0502-B-18-15T-R [mm]
  rect 0.3x0.92 smd: 1(-4.25,1.35) 2(-3.75,1.35) 3(-3.25,1.35) 4(-2.75,1.35) 5(-2.25,1.35) 6(-1.75,1.35) 7(-1.25,1.35) 8(-0.75,1.35) 9(-0.25,1.35) 10(0.25,1.35) 11(0.75,1.35) 12(1.25,1.35) 13(1.75,1.35) 14(2.25,1.35) 15(2.75,1.35) 16(3.25,1.35) 17(3.75,1.35) 18(4.25,1.35)
  rect 1.1x1.8 smd: MP1(-6.42,-1.35) MP2(6.42,-1.35)
  silkscreen extent -6.58,-2.74 6.58,1.5, body extent -6.55,-3.66 6.55,1.69, height 2.03
"Fuse 1206 (3216 Metric)" [mm] "0.126\" L x 0.062\" W x 0.026\" H (3.20mm x 1.58mm x 0.65mm)"
  rect 1.06x1.82 smd: 1(-1.528,0) 2(1.528,0)
  silkscreen extent -0.68,-0.85 0.68,0.85, body extent -1.6,-0.79 1.6,0.79, height 0.85
"IND-0603 (1608 Metric)" [mm] "0.063\" L x 0.032\" W (1.60mm x 0.80mm)"
  rect 0.6x0.8 smd: 1(-0.7,0) 2(0.7,0)
  silkscreen extent -0.2,-0.46 0.23,0.46, body extent -0.8,-0.4 0.8,0.4, height 0.78
IND-1206 [mm]
  rect 1.4x1.82 smd: 1(-1.36,0) 2(1.36,0)
  silkscreen extent -0.34,-0.85 0.34,0.85, body extent -1.6,-0.8 1.6,0.8, height 1.3
J102K1CS33VDC.20 [mm]
  rect 2x2 hole 1.02: 1(0,0)
  round 2 hole 1.02: 2(10.16,-7.62) 3(12.7,-7.62) 4(10.16,0) 5(12.7,0)
  silkscreen extent -1.42,-9.1 14.12,1.48, body extent -1.42,-9.1 14.12,1.48, height 11.8
LED-0603 [mm]
  rect 0.5x1 smd: 1(-0.75,0) 2(0.75,0)
  silkscreen extent -1.12,-0.66 1.75,0.66, body extent -0.82,-0.37 0.82,0.36, height 0.68
LVC505040-6R8M-N_ [mm]
  rect 1.6x4.2 smd: 1(-1.8,0) 2(1.8,0)
  silkscreen extent -1.61,-2.62 1.61,2.62, body extent -2.5,-2.5 2.5,2.5, height 2
NRS5024T2R2NMGJ [mm]
  rect 1.5x4 smd: 1(-1.8,0) 2(1.8,0)
  silkscreen extent -2.51,-2.51 2.49,2.51, body extent -2.45,-2.45 2.45,2.45, height 2.5
PicoStar-3 [mm]
  rect 0.152x0.25 smd mask+0.05: 1(-0.175,-0.2) 2(0.175,-0.2)
  rect 0.5x0.152 smd mask+0.05: 3(0,0.2)
  silkscreen extent -0.41,-0.43 0.36,0.38, body extent -0.3,-0.38 0.3,0.32, height 0.2
PKMCS0909E4000-R1 [mm]
  rect 1.3x3.4 smd: 1(-4.35,0) 2(4.35,0)
  silkscreen extent -5.31,-4.55 5.31,4.55, body extent -4.5,-4.5 4.5,4.5, height 1.9
"Pogo 4 Pin" [mm]
  round 1.6 smd: 1(-3.75,0) 2(-1.25,0) 3(1.25,0) 4(3.75,0)
  silkscreen extent -5.11,-1.09 4.83,1.09
Res-0201 [mm]
  rect 0.27x0.37 smd mask+0.055: 1(-0.275,0) 2(0.275,0)
  silkscreen extent -0.48,-0.25 0.48,0.25, body extent -0.3,-0.15 0.3,0.15, height 0.29
Res-0402 [mil]
  rect 18x25 smd mask+2.17: 1(-18.5,0) 2(18.5,0)
  silkscreen extent -32,-17 32,16, body extent -23,-11 23,11, height 16
Res-0603 [mil]
  rect 30x35 smd: 1(-30,0) 2(30,0)
  silkscreen extent -48,-21 48,21, body extent -31,-17 31,17, height 18
RES-0805 [mil] "SMD 0805"
  rect 40x50 smd: 1(-40,0) 2(40,0)
  silkscreen extent -64,-29 64,29, body extent -39,-25 39,24, height 24
Res-0805 [mil] "SMD 0805"
  rect 40x50 smd: 1(-40,0) 2(40,0)
  silkscreen extent -64,-29 64,29, body extent -39,-25 39,24, height 24
Res-1206 [mil]
  rect 60x70 smd: 1(-50,0) 2(50,0)
  silkscreen extent -84,-39 84,39, body extent -63,-31 63,31, height 24
Res_1210 [mm]
  rect 1.14x2.72 smd: 1(-1.49,0) 2(1.49,0)
  silkscreen extent -2.16,-1.45 2.16,1.45, body extent -1.6,-1.25 1.6,1.25, height 0.7
SMA [mm]
  rect 2.5x1.7 smd: 1(-2,0) 2(2,0)
  silkscreen extent -4.45,-1.42 2.06,1.42, body extent -2.6,-1.3 2.6,1.3, height 2.4
SOD323F [mm]
  rect 0.6x0.6 smd: 1(-1.05,0) 2(1.05,0)
  silkscreen extent -0.91,-0.78 2.11,0.79, body extent -1.25,-0.67 1.25,0.68, height 1
SOD-323 [mm]
  rect 0.8x0.9 smd mask+0.055: 1(-1.15,0) 2(1.15,0)
  silkscreen extent -2.01,-0.79 0.94,0.79, body extent -1.3,-0.67 1.3,0.67, height 1.1
SOIC-8 [mm]
  rect 1.55x0.6 smd: 1(-2.7,1.905) 2(-2.7,0.635) 3(-2.7,-0.635) 4(-2.7,-1.905) 5(2.7,-1.905) 6(2.7,-0.635) 7(2.7,0.635) 8(2.7,1.905)
  silkscreen extent -3.76,-2.49 1.99,2.49, body extent -3,-2.45 3,2.45, height 1.7
"SOIC-8 (208 mil)" [mm]
  rect 1.61x0.58 smd: 1(-3.605,1.905) 2(-3.605,0.635) 3(-3.605,-0.635) 4(-3.605,-1.905) 5(3.605,-1.905) 6(3.605,-0.635) 7(3.605,0.635) 8(3.605,1.905)
  silkscreen extent -4.7,-2.69 2.69,2.69, body extent -3.95,-2.64 3.95,2.64, height 2.16
Sot-23 [mm] "TRANS NPN 40V 0.6A SOT23"
  rect 0.82x0.92 smd: 1(-0.95,-1) 2(0.95,-1) 3(0,1)
  silkscreen extent -1.68,-1.3 1.55,0.81, body extent -1.5,-1.25 1.5,1.25, height 1.05
SOT-23 [mm] "TRANS NPN 40V 0.6A SOT23"
  rect 0.82x0.92 smd: 1(-0.95,-1) 2(0.95,-1) 3(0,1)
  silkscreen extent -1.68,-1.3 1.55,0.81, body extent -1.5,-1.25 1.5,1.25, height 1.05
SOT-23-3L_ [mm]
  rect 0.82x0.92 smd: 1(-0.95,-1) 2(0.95,-1) 3(0,1)
  silkscreen extent -1.65,-1.17 1.56,0.86, body extent -1.5,-1.25 1.5,1.25, height 1.1
SOT-723 [mm]
  rect 0.5x0.45 smd: 1(-0.4,-0.575) 2(0.4,-0.575) 3(0,0.575)
  silkscreen extent -0.94,-0.66 0.64,0.64, body extent -0.6,-0.6 0.6,0.6, height 0.5
SOT_323 [mm]
  rect 0.5x0.8 smd: 1(-0.65,-1.1) 2(0.65,-1.1) 3(0,1.1)
  silkscreen extent -1.19,-1.19 1.04,0.64, body extent -1.05,-1.15 1.05,1.15, height 1
SSOP-28-208mil [mm]
  rect 1.25x0.42 smd: 1(-3.4,4.225) 2(-3.4,3.575) 3(-3.4,2.925) 4(-3.4,2.275) 5(-3.4,1.625) 6(-3.4,0.975) 7(-3.4,0.325) 8(-3.4,-0.325) 9(-3.4,-0.975) 10(-3.4,-1.625) 11(-3.4,-2.275) 12(-3.4,-2.925) 13(-3.4,-3.575) 14(-3.4,-4.225) 15(3.4,-4.225) 16(3.4,-3.575) 17(3.4,-2.925) 18(3.4,-2.275) 19(3.4,-1.625) 20(3.4,-0.975) 21(3.4,-0.325) 22(3.4,0.325) 23(3.4,0.975) 24(3.4,1.625) 25(3.4,2.275) 26(3.4,2.925) 27(3.4,3.575) 28(3.4,4.225)
  silkscreen extent -4.34,-5.21 2.72,5.21, body extent -3.88,-5.17 3.88,5.17, height 2.15
Test-point [mil]
  oct 60x60 smd: 1(0,0)
  silkscreen extent -37,-37 37,37
TSOT-23-6 [mm]
  rect 1x0.6 smd: 1(-1.2,0.95) 2(-1.2,0) 3(-1.2,-0.95) 4(1.2,-0.95) 5(1.2,0) 6(1.2,0.95)
  silkscreen extent -1.98,-1.5 0.86,1.5, body extent -1.41,-1.45 1.41,1.45, height 1
TYPE-C-31-M-12_ [mm]
  rect 0.6x1.2 smd: A1/B12(0,0) A4/B9(0.8,0) B1/A12(6.4,0) B4/A9(5.6,0)
  rect 0.3x1.2 smd: A5(1.95,0) A6(2.95,0) A7(3.45,0) A8(4.45,0) B5(4.95,0) B6(3.95,0) B7(2.45,0) B8(1.45,0)
  round 0 hole 0.62 unplated: MH(0.31,-1.07) MH(6.09,-1.07)
  oval 0.9x2 hole 0.6 slot 1.7 at 90 deg: S1(7.525,-0.57) S4(-1.125,-0.57)
  oval 0.9x1.7 hole 0.6 slot 1.4 at 90 deg: S2(7.525,-4.75) S3(-1.125,-4.75)
  silkscreen extent -1.3,-5.94 7.7,-1.93, body extent -1.27,-7.32 7.67,0.58, height 3.31
VLS5045EX-3R3N [mm]
  rect 1.6x4.2 smd: 1(-1.8,0) 2(1.8,0)
  silkscreen extent -2.54,-2.57 2.54,2.57, body extent -2.5,-2.5 2.5,2.5, height 4.5
"Voltlink Target" [mm]
  rect 0.5x1.6 smd: 1(-2.5,-1.262) 2(-1.5,-1.262) 3(-0.5,-1.262) 4(0.5,-1.262) 5(1.5,-1.262) 6(2.5,-1.262)
  rect 1.2x1.8 smd: MP1(-3.8,1.262) MP2(3.8,1.262)
  silkscreen extent -4.06,-1.68 4.06,2.17, body extent -4,-1.49 4,2.11, height 4.25
VSOF-5 [mm]
  rect 0.35x0.25 smd: 1(-0.675,0.5) 2(-0.675,0) 3(-0.675,-0.5) 4(0.675,-0.5) 5(0.675,0.5)
  silkscreen extent -1.12,-0.86 0.51,0.86, body extent -0.8,-0.82 0.8,0.82, height 0.6
X322540MPB4SI_ [mm]
  rect 1.4x1.2 smd: 1(-1.1,-0.85) 2(1.1,-0.85) 3(1.1,0.85) 4(-1.1,0.85)
  silkscreen extent -2.13,-1.3 1.65,1.3, body extent -1.6,-1.25 1.6,1.25, height 0.8

## Part data
C1: library part CC0603JRNPO9BN472, "CAP CER 4700PF 50V C0G/NPO 0603", LCSC Part Number=C576818, Manufacturer=Yageo, Supplier Part Number 1=13-CC0603JRNPO9BN472CT-ND, Category="Ceramic Capacitors", ComponentLink1Description=LCSC, ComponentLink1URL=https://www.lcsc.com/product-detail/Multilayer-Ceramic-Capacitors-MLCC-SMD-SMT_YAGEO-CC0603JRNPO9BN472_C576818.html, Item Type=Capacitor, Manufacturer Part Number=CC0603JRNPO9BN472, Pricing 1="1=0.48000, 10=0.33000, 50=0.23100, 100=0.19800, 500=0.14854, 1000=0.12543 (USD)", RoHS=Yes, RoHS Compliant=Yes, Stock 1=31779, Supplier 1=Digi-Key
C2 C3 C4 C10 C11 C12 C15 C20 C21 C23 C26 C31 C32 C33 C36 C37 C39 C42 C43 C46 C47 C48: library part GRM155R62A104KE14D, "CAP CER 0.1UF 100V X5R 0402", Capacitance=100nF, Case Code (Imperial)=0402, Case Code (Metric)=1005, Dielectric=X5R, LCSC Part Number=C162178, Manufacturer=Murata, Max Operating Temperature=85°C, Min Operating Temperature=-55°C, Package Quantity=10000, Tolerance=10%, Voltage Rating=100V, Case/Package=0402, Category="Ceramic Capacitors", ComponentLink1Description=http://www.farnell.com/datasheets/2079151.pdf?src-supplier=Farnell, ComponentLink1URL=http://www.farnell.com/datasheets/2079151.pdf?src-supplier=Farnell, ComponentLink2Description=http://www.mouser.com/ds/2/281/c02e-2905.pdf?src-supplier=Mouser, ComponentLink2URL=http://www.mouser.com/ds/2/281/c02e-2905.pdf?src-supplier=Mouser, ComponentLink3Description=http://www.farnell.com/datasheets/2079151.pdf?src-supplier=Element14, ComponentLink3URL=http://www.farnell.com/datasheets/2079151.pdf?src-supplier=Element14, ComponentLink4Description=http://search.murata.co.jp/Ceramy/image/img/A01X/G101/ENG/GRM155R62A104KE14-01.pdf?src-supplier=Digi-Key, ComponentLink4URL=http://search.murata.co.jp/Ceramy/image/img/A01X/G101/ENG/GRM155R62A104KE14-01.pdf?src-supplier=Digi-Key, ComponentLink5Description=http://www.farnell.com/datasheets/2079151.pdf?src-supplier=Newark, ComponentLink5URL=http://www.farnell.com/datasheets/2079151.pdf?src-supplier=Newark, Height=0.5mm, Item Type=Capacitor, Lead Free="Lead Free", Length=0.039inch, Manufacturer Part Number=GRM155R62A104KE14D, Mount="Surface Mount", Packaging="Tape and Reel", Pricing 1="10000=0.00500, 20000=0.00410, 30000=0.00390, 50000=0.00370, 100000=0.00300 (USD)", Reach SVHC Compliant=Yes, RoHS=Yes, RoHS Compliant=Yes, Series=GRM, Stock 1=870000, Supplier 1="Arrow Electronics", Supplier Part Number 1=GRM155R62A104KE14D, Termination=SMD/SMT, Thickness=0.022inch, Voltage Rating (DC)=100V, Weight=0.000212oz, Width=0.02inch
C5 C7 C13 C14 C22 C29 C34: library part CL05A106MP5NUNC, "CAP CER 10UF 10V X5R 0402", Case Code (Imperial)=0402, Case Code (Metric)=1005, Dielectric=X5R, LCSC Part Number=C315248, Manufacturer=Samsung, Max Operating Temperature=85°C, Min Operating Temperature=-55°C, Package Quantity=1, Tolerance=20%, Voltage Rating=10V, Capacitance=10uF, Case/Package=0402, Category="Ceramic Capacitors", ComponentLink1Description=https://datasheet.ciiva.com/25721/cl05a106mp5nunc-25721584.pdf?src-supplier=Digi-Key, ComponentLink1URL=https://datasheet.ciiva.com/25721/cl05a106mp5nunc-25721584.pdf?src-supplier=Digi-Key, ComponentLink2Description=https://datasheet.ciiva.com/26838/getdatasheetpartid-745310-26838170.pdf?src-supplier=Verical, ComponentLink2URL=https://datasheet.ciiva.com/26838/getdatasheetpartid-745310-26838170.pdf?src-supplier=Verical, Construction=Flat, Contact Plating=Tin, Depth=0.5mm, Item Type=Capacitor, Lead Free="Lead Free", Length=1mm, Manufacturer Part Number=CL05A106MP5NUNC, Mount="Surface Mount", Packaging="Tape and Reel", Pricing 1="10000=0.02537 (USD)", Radiation Hardening=No, RoHS=Yes, RoHS Compliant=Yes, Series=CL, Stock 1=1729850, Supplier 1=Avnet, Supplier Part Number 1=CL05A106MP5NUNC, Termination=Wraparound, Thickness=0.028inch, Width=0.02inch
C6: library part CC0805KKX5R8BB225, "CAP CER 2.2UF 25V X5R 0805", Case Code (Imperial)=0805, Case Code (Metric)=2012, Dielectric=X5R, LCSC Part Number=C277526, Manufacturer=Yageo, Max Operating Temperature=85°C, Min Operating Temperature=-55°C, Resistor Type=Ceramic, Supplier Part Number 1=603-CC805KKX5R8BB225, Tolerance=10%, Voltage Rating=25V, Capacitance=2.2uF, Case/Package=0805, Category="Ceramic Capacitors", ComponentLink1Description=https://datasheet.ciiva.com/11583/upy-gphc-x5r-4v-to-50v-12-11583590.pdf?src-supplier=Avnet, ComponentLink1URL=https://datasheet.ciiva.com/11583/upy-gphc-x5r-4v-to-50v-12-11583590.pdf?src-supplier=Avnet, Construction=Flat, Depth=1.25mm, Halogen Free="Halogen Free", Height=0.85mm, Lead Free="Lead Free", Length=2mm, Manufacturer Part Number=CC0805KKX5R8BB225, Mount="Surface Mount", Packaging="Tape and Reel", Pricing 1="1=0.33000, 10=0.15100, 50=0.15100, 100=0.14800, 500=0.14600, 1000=0.14500, 3000=0.14400, 10000=0.14400 (USD)", Radiation Hardening=No, RoHS=Yes, RoHS Compliant=Yes, Series=CC, Stock 1=2849, Supplier 1=Mouser, Thickness=0.057inch, Voltage Rating (DC)=25V, Width=0.049inch
C8 C16 C17 C27 C30 C35 C38 C44: library part UMK105CBJ105MV-F, "CAP CER 1UF 50V X5R 0402", LCSC Part Number=C2880413, Manufacturer="Taiyo Yuden", Supplier Part Number 1=587-6278-1-ND, ComponentLink1Description=http://www.farnell.com/datasheets/2801300.pdf?src-supplier=Newark, ComponentLink1URL=http://www.farnell.com/datasheets/2801300.pdf?src-supplier=Newark, ComponentLink2Description=http://www.farnell.com/datasheets/2801300.pdf?src-supplier=Farnell, ComponentLink2URL=http://www.farnell.com/datasheets/2801300.pdf?src-supplier=Farnell, ComponentLink3Description="https://ds.yuden.co.jp/TYCOMPAS/ut/detail?pn=UMK105CBJ105MV-F &amp;u=M&src-supplier=Digi-Key", ComponentLink3URL="https://ds.yuden.co.jp/TYCOMPAS/ut/detail?pn=UMK105CBJ105MV-F &amp;u=M&src-supplier=Digi-Key", Item Type=Capacitor, Lead Free="Lead Free", Manufacturer Part Number=UMK105CBJ105MV-F, Pricing 1="1=0.27, 10=0.184, 50=0.1224, 100=0.104, 500=0.07342, 1000=0.06424, 2500=0.06118, 5000=0.05659 (USD)", RoHS Compliant=Yes, Stock 1=412061, Supplier 1=Digi-Key
C9: library part GRM155R71E473KA88D, "CAP CER 0.047UF 25V X7R 0402", Case Code (Imperial)=0402, Case Code (Metric)=1005, Dielectric=X7R, LCSC Part Number=C77017, Manufacturer=Murata, Max Operating Temperature=125°C, Min Operating Temperature=-55°C, Package Quantity=1, Supplier Part Number 1=2478015P, Tolerance=10%, Voltage=25V, Case/Package=0402, Category="Ceramic Capacitors", ComponentLink1Description=https://datasheet.ciiva.com/34302/1856425-34302854.pdf?src-supplier=Jameco, ComponentLink1URL=https://datasheet.ciiva.com/34302/1856425-34302854.pdf?src-supplier=Jameco, ComponentLink2Description=https://datasheet.ciiva.com/131/grm155r71e473ka88-01-131494.pdf?src-supplier=Digi-Key, ComponentLink2URL=https://datasheet.ciiva.com/131/grm155r71e473ka88-01-131494.pdf?src-supplier=Digi-Key, ComponentLink3Description=https://datasheet.ciiva.com/18184/getdatasheetpartid-153136-18184712.pdf?src-supplier=Verical, ComponentLink3URL=https://datasheet.ciiva.com/18184/getdatasheetpartid-153136-18184712.pdf?src-supplier=Verical, ComponentLink4Description=https://datasheet.ciiva.com/29199/454180-da-01-en-vs-kondensator-0402-29199826.pdf?src-supplier=Conrad, ComponentLink4URL=https://datasheet.ciiva.com/29199/454180-da-01-en-vs-kondensator-0402-29199826.pdf?src-supplier=Conrad, ComponentLink5Description=https://datasheet.ciiva.com/14103/grmseries-highdielectrictype-eng-14103754.pdf?src-supplier=Distrelec, ComponentLink5URL=https://datasheet.ciiva.com/14103/grmseries-highdielectrictype-eng-14103754.pdf?src-supplier=Distrelec, ComponentLink6Description=https://datasheet.ciiva.com/7937/608985-7937623.pdf?src-supplier=Element14, ComponentLink6URL=https://datasheet.ciiva.com/7937/608985-7937623.pdf?src-supplier=Element14, ComponentLink7Description=https://datasheet.ciiva.com/131/grm155r71e473ka88-01-131493.pdf?src-supplier=Digi-Key, ComponentLink7URL=https://datasheet.ciiva.com/131/grm155r71e473ka88-01-131493.pdf?src-supplier=Digi-Key, ComponentLink8Description=https://datasheet.ciiva.com/131/grm155r71e473ka88-01-131492.pdf?src-supplier=Digi-Key, ComponentLink8URL=https://datasheet.ciiva.com/131/grm155r71e473ka88-01-131492.pdf?src-supplier=Digi-Key, ComponentLink9Description=https://datasheet.ciiva.com/5424/product-5424844.pdf?src-supplier=Mouser, ComponentLink9URL=https://datasheet.ciiva.com/5424/product-5424844.pdf?src-supplier=Mouser, ComponentLink10Description=https://datasheet.ciiva.com/2989/product-2989395.pdf?src-supplier=Avnet, ComponentLink10URL=https://datasheet.ciiva.com/2989/product-2989395.pdf?src-supplier=Avnet, ComponentLink11Description=https://datasheet.ciiva.com/16213/product-16213823.pdf?src-supplier=Future+Electronics, ComponentLink11URL=https://datasheet.ciiva.com/16213/product-16213823.pdf?src-supplier=Future+Electronics, Construction=Flat, Depth=0.5mm, Height=0.5mm, Item Type=Capacitor, Lead Free="Lead Free", Length=1mm, Manufacturer Part Number=GRM155R71E473KA88D, Material=Ceramic, Mounting Technology="Surface Mount", Packaging="Tape and Reel", Pins=2, Pricing 1="1000=0.00007, 8000=0.00900 (GBP)", Radiation Hardening=No, Reach SVHC Compliant=Yes, RoHS=Yes, RoHS Compliant=Yes, Series=GRM, Stock 1=10000, Supplier 1=Rs, Termination=SMD/SMT, Thickness=0.022inch, Voltage Rating=25V, Voltage Rating (DC)=25V, Width=0.02inch
C18: library part EMK325ABJ107MM-P, "CAP CER 100UF 16V X5R 1210", Case Code (Imperial)=1210, Case Code (Metric)=3225, LCSC Part Number=C90143, Manufacturer="Taiyo Yuden", Max Operating Temperature=85°C, Min Operating Temperature=-55°C, Supplier Part Number 1=587-5426-1-ND, Tolerance=20%, Voltage Rating=16V, Case/Package=1210, Category="Ceramic Capacitors", ComponentLink1Description=http://ds.yuden.co.jp/TYCOMPAS/ut/detail.do?productNo=EMK325ABJ107MM-P&fileName=EMK325ABJ107MM-P_SS&mode=specSheetDownload&src-supplier=Digi-Key, ComponentLink1URL=http://ds.yuden.co.jp/TYCOMPAS/ut/detail.do?productNo=EMK325ABJ107MM-P&fileName=EMK325ABJ107MM-P_SS&mode=specSheetDownload&src-supplier=Digi-Key, Item Type=Capacitor, Lead Free="Lead Free", Manufacturer Part Number=EMK325ABJ107MM-P, Mounting Technology="Surface Mount", Packaging="Cut Tape", Pricing 1="1=1.75, 10=1.415, 50=1.2352, 100=1.0809, 500=0.82352 (USD)", RoHS=Yes, RoHS Compliant=Yes, Series=M, Stock 1=81344, Supplier 1=Digi-Key
C19 C24 C25: library part CC0805MKX5R8BB226, "CAP CER 22UF 25V X5R 0805", Case Code (Imperial)=0805, Case Code (Metric)=2012, Dielectric=X5R, LCSC Part Number=C784585, Manufacturer=Yageo, Max Operating Temperature=85°C, Min Operating Temperature=-55°C, Package Quantity=3000, Supplier Part Number 1=311-1903-1-ND, Tolerance=20%, Voltage Rating=25V, Capacitance=22uF, Case/Package=0805, Category="Ceramic Capacitors", ComponentLink1Description=http://www.mouser.com/ds/2/447/Yageo_UPY-GP_NP0_16V-to-50V_9-358835.pdf?src-supplier=Mouser, ComponentLink1URL=http://www.mouser.com/ds/2/447/Yageo_UPY-GP_NP0_16V-to-50V_9-358835.pdf?src-supplier=Mouser, ComponentLink2Description=http://www.yageo.com/documents/recent/UPY-GPHC_X5R_4V-to-50V_25.pdf?src-supplier=Digi-Key, ComponentLink2URL=http://www.yageo.com/documents/recent/UPY-GPHC_X5R_4V-to-50V_25.pdf?src-supplier=Digi-Key, Halogen Free="Halogen Free", Height=1.25mm, Item Type=Capacitor, Lead Free="Lead Free", Length=0.079inch, Manufacturer Part Number=CC0805MKX5R8BB226, Mount="Surface Mount", Packaging="Tape and Reel", Pricing 1="1=0.47000, 10=0.33300, 50=0.25140, 100=0.21900, 500=0.16222, 1000=0.13789 (USD)", RoHS=Yes, RoHS Compliant=Yes, Stock 1=64970, Supplier 1=Digi-Key, Termination=SMD/SMT, Thickness=0.057inch, Voltage Rating (DC)=25V, Weight=0.000194oz, Width=0.049inch
C28: library part CC0402KRX7R9BB103, "CAP CER 10000PF 50V X7R 0402", Case Code (Imperial)=0402, Case Code (Metric)=1005, Dielectric=X7R, LCSC Part Number=C60133, Manufacturer=Yageo, Max Operating Temperature=125°C, Min Operating Temperature=-55°C, Package Quantity=1, Resistor Type=Ceramic, Tolerance=10%, Voltage=50V, Capacitance=10nF, Case/Package=0402, Category="Ceramic Capacitors", ComponentLink1Description=https://datasheet.ciiva.com/11788/0900766b8079c870-11788375.pdf?src-supplier=RSComponents, ComponentLink1URL=https://datasheet.ciiva.com/11788/0900766b8079c870-11788375.pdf?src-supplier=RSComponents, ComponentLink2Description=https://datasheet.ciiva.com/26862/getdatasheetpartid-138248-26862642.pdf?src-supplier=Verical, ComponentLink2URL=https://datasheet.ciiva.com/26862/getdatasheetpartid-138248-26862642.pdf?src-supplier=Verical, ComponentLink3Description=https://datasheet.ciiva.com/7978/1489800-7978093.pdf?src-supplier=Element14, ComponentLink3URL=https://datasheet.ciiva.com/7978/1489800-7978093.pdf?src-supplier=Element14, ComponentLink4Description=https://datasheet.ciiva.com/28450/1489800-28450377.pdf?src-supplier=Element14, ComponentLink4URL=https://datasheet.ciiva.com/28450/1489800-28450377.pdf?src-supplier=Element14, ComponentLink5Description=https://datasheet.ciiva.com/176/mlccorderingcode-176349.pdf?src-supplier=Digi-Key, ComponentLink5URL=https://datasheet.ciiva.com/176/mlccorderingcode-176349.pdf?src-supplier=Digi-Key, ComponentLink6Description=https://datasheet.ciiva.com/176/mlccorderingcode-176348.pdf?src-supplier=Digi-Key, ComponentLink6URL=https://datasheet.ciiva.com/176/mlccorderingcode-176348.pdf?src-supplier=Digi-Key, ComponentLink7Description=https://datasheet.ciiva.com/176/mlccorderingcode-176350.pdf?src-supplier=Digi-Key, ComponentLink7URL=https://datasheet.ciiva.com/176/mlccorderingcode-176350.pdf?src-supplier=Digi-Key, Depth=0.5mm, Halogen Free="Halogen Free", Height=0.5mm, Item Type=Capacitor, Lead Free="Lead Free", Length=1mm, Manufacturer Part Number=CC0402KRX7R9BB103, Mount="Surface Mount", Packaging="Tape and Reel", Pricing 1="10000=0.00178 (USD)", Radiation Hardening=No, Reach SVHC Compliant=Yes, RoHS=Yes, RoHS Compliant=Yes, Series=CC, Stock 1=995000, Supplier 1=Avnet, Supplier Part Number 1=CC0402KRX7R9BB103, Termination=SMD/SMT, Thickness=0.022inch, Voltage Rating=50V, Voltage Rating (DC)=50V, Width=0.02inch
C40 C41: library part CC0402JRNPO9BN220, "CAP CER 22PF 50V C0G/NPO 0402", Case Code (Imperial)=0402, Case Code (Metric)=1005, Dielectric=C0G, Dielectric Material=Ceramic, Insulation Resistance=100GR, LCSC Part Number=C106203, Manufacturer=Yageo, Max Operating Temperature=125°C, Min Operating Temperature=-55°C, Package Quantity=1, Supplier Part Number 1=9105957, Temperature Coefficient=30ppm/°C, Tolerance=5%, Voltage=50V, Case/Package=0402, Category="Ceramic Capacitors", ComponentLink1Description=https://datasheet.ciiva.com/5789/1443161-5789509.pdf?src-supplier=Farnell, ComponentLink1URL=https://datasheet.ciiva.com/5789/1443161-5789509.pdf?src-supplier=Farnell, ComponentLink2Description=https://datasheet.ciiva.com/8033/1443161-8033606.pdf?src-supplier=Element14, ComponentLink2URL=https://datasheet.ciiva.com/8033/1443161-8033606.pdf?src-supplier=Element14, ComponentLink3Description=https://datasheet.ciiva.com/7656/1132289-7656615.pdf?src-supplier=Element14, ComponentLink3URL=https://datasheet.ciiva.com/7656/1132289-7656615.pdf?src-supplier=Element14, ComponentLink4Description=https://datasheet.ciiva.com/8033/1443161-8033607.pdf?src-supplier=Element14, ComponentLink4URL=https://datasheet.ciiva.com/8033/1443161-8033607.pdf?src-supplier=Element14, ComponentLink5Description=https://datasheet.ciiva.com/8033/1443161-8033605.pdf?src-supplier=Element14, ComponentLink5URL=https://datasheet.ciiva.com/8033/1443161-8033605.pdf?src-supplier=Element14, ComponentLink6Description=https://datasheet.ciiva.com/143/mlccorderingcode-143987.pdf?src-supplier=Digi-Key, ComponentLink6URL=https://datasheet.ciiva.com/143/mlccorderingcode-143987.pdf?src-supplier=Digi-Key, ComponentLink7Description=https://datasheet.ciiva.com/143/mlccorderingcode-143986.pdf?src-supplier=Digi-Key, ComponentLink7URL=https://datasheet.ciiva.com/143/mlccorderingcode-143986.pdf?src-supplier=Digi-Key, ComponentLink8Description=https://datasheet.ciiva.com/143/mlccorderingcode-143988.pdf?src-supplier=Digi-Key, ComponentLink8URL=https://datasheet.ciiva.com/143/mlccorderingcode-143988.pdf?src-supplier=Digi-Key, ComponentLink9Description=https://datasheet.ciiva.com/5425/upy-gp-np0-16v-to-50v-8-5425483.pdf?src-supplier=Mouser, ComponentLink9URL=https://datasheet.ciiva.com/5425/upy-gp-np0-16v-to-50v-8-5425483.pdf?src-supplier=Mouser, ComponentLink10Description=https://datasheet.ciiva.com/15189/getdatasheetpartid-370074-15189117.pdf?src-supplier=Verical, ComponentLink10URL=https://datasheet.ciiva.com/15189/getdatasheetpartid-370074-15189117.pdf?src-supplier=Verical, Depth=0.5mm, Height=0.5mm, Item Type=Capacitor, Lead Free="Lead Free", Length=1mm, Manufacturer Part Number=CC0402JRNPO9BN220, Mounting Technology="Surface Mount", Packaging="Tape and Reel", Pins=2, Pricing 1="10000=0.00220, 40000=0.00210, 150000=0.00200, 400000=0.00190, 1000000=0.00180 (USD)", Radiation Hardening=No, Reach SVHC Compliant=Yes, Resistor Type=Ceramic, RoHS=Yes, RoHS Compliant=Yes, Series=CC, Stock 1=200000, Supplier 1="Future Electronics", Termination=SMD/SMT, Thickness=0.022inch, Voltage Rating=50V, Voltage Rating (DC)=50V, Width=0.02inch
C45: library part CC0201KRX5R8BB102, "CAP CER 1000PF 25V X5R 0201", Case/Package=0201, Dielectric=X5R, LCSC Part Number=C541213, Manufacturer=Yageo, Max Operating Temperature=85°C, Min Operating Temperature=-55°C, Supplier Part Number 1=603-CC0201KR8BB102, Tolerance=10%, Voltage Rating=25V, Capacitance=1nF, Category="Ceramic Capacitors", ComponentLink1Description=http://www.yageo.com/documents/recent/UPY-GPHC_X5R_4V-to-50V_25.pdf?src-supplier=Digi-Key, ComponentLink1URL=http://www.yageo.com/documents/recent/UPY-GPHC_X5R_4V-to-50V_25.pdf?src-supplier=Digi-Key, ComponentLink2Description=https://www.yageo.com/upload/media/product/productsearch/datasheet/mlcc/UPY-GPHC_X5R_4V-to-50V_25.pdf?src-supplier=Digi-Key, ComponentLink2URL=https://www.yageo.com/upload/media/product/productsearch/datasheet/mlcc/UPY-GPHC_X5R_4V-to-50V_25.pdf?src-supplier=Digi-Key, ComponentLink3Description=http://www.yageo.com/exep/pages/download/literatures/ProductSelectionGuide%202014_Final_2.pdf?src-supplier=Digi-Key, ComponentLink3URL=http://www.yageo.com/exep/pages/download/literatures/ProductSelectionGuide%202014_Final_2.pdf?src-supplier=Digi-Key, Halogen Free="Halogen Free", Lead Free="Lead Free", Length=0.024inch, Manufacturer Part Number=CC0201KRX5R8BB102, Mount="Surface Mount", Packaging="Tape and Reel", Pricing 1="1=0.10000, 10=0.02600, 50=0.02600, 100=0.01100, 1000=0.00700, 10000=0.00500 (USD)", RoHS=Yes, RoHS Compliant=Yes, Stock 1=54104, Supplier 1=Mouser, Thickness=0.013inch, Voltage Rating (DC)=25V, Width=0.012inch